# Altium PCB Isolated_Power_Board.pcbdoc
Units mil, origin at the board's own origin, x right, y up, seen from the top; angles counter-clockwise.
Board outline 3937.01 x 3937.01 mil, 2 copper layers (Top Layer, Bottom Layer); 28 components, 6 nets, 108 pads, 0 vias.
Unrouted connection lines stored in the file: 6.
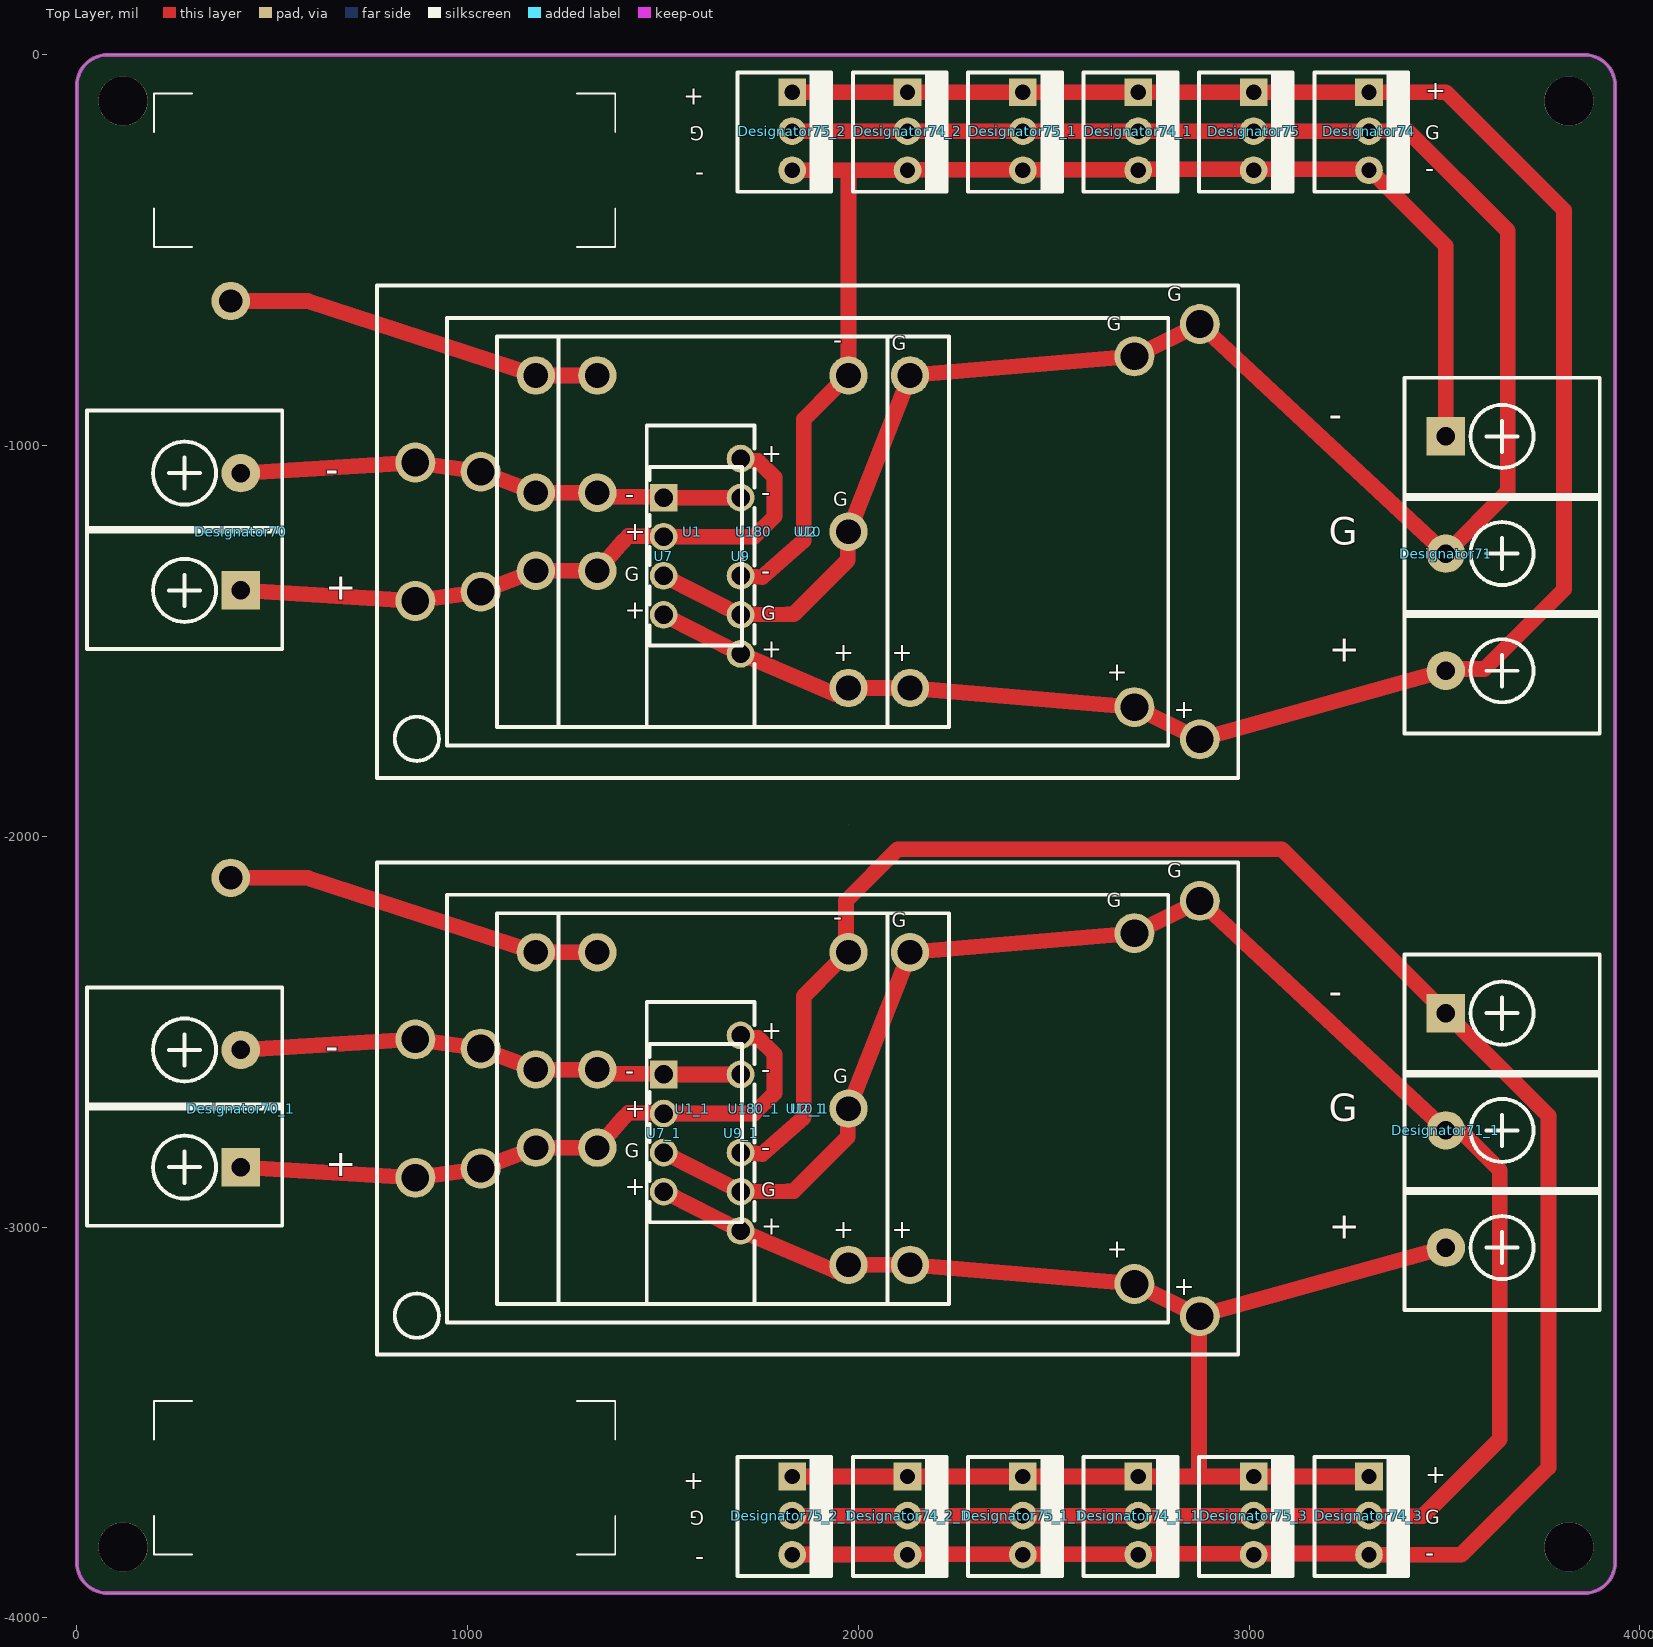
[diagram p0: Top Layer view]
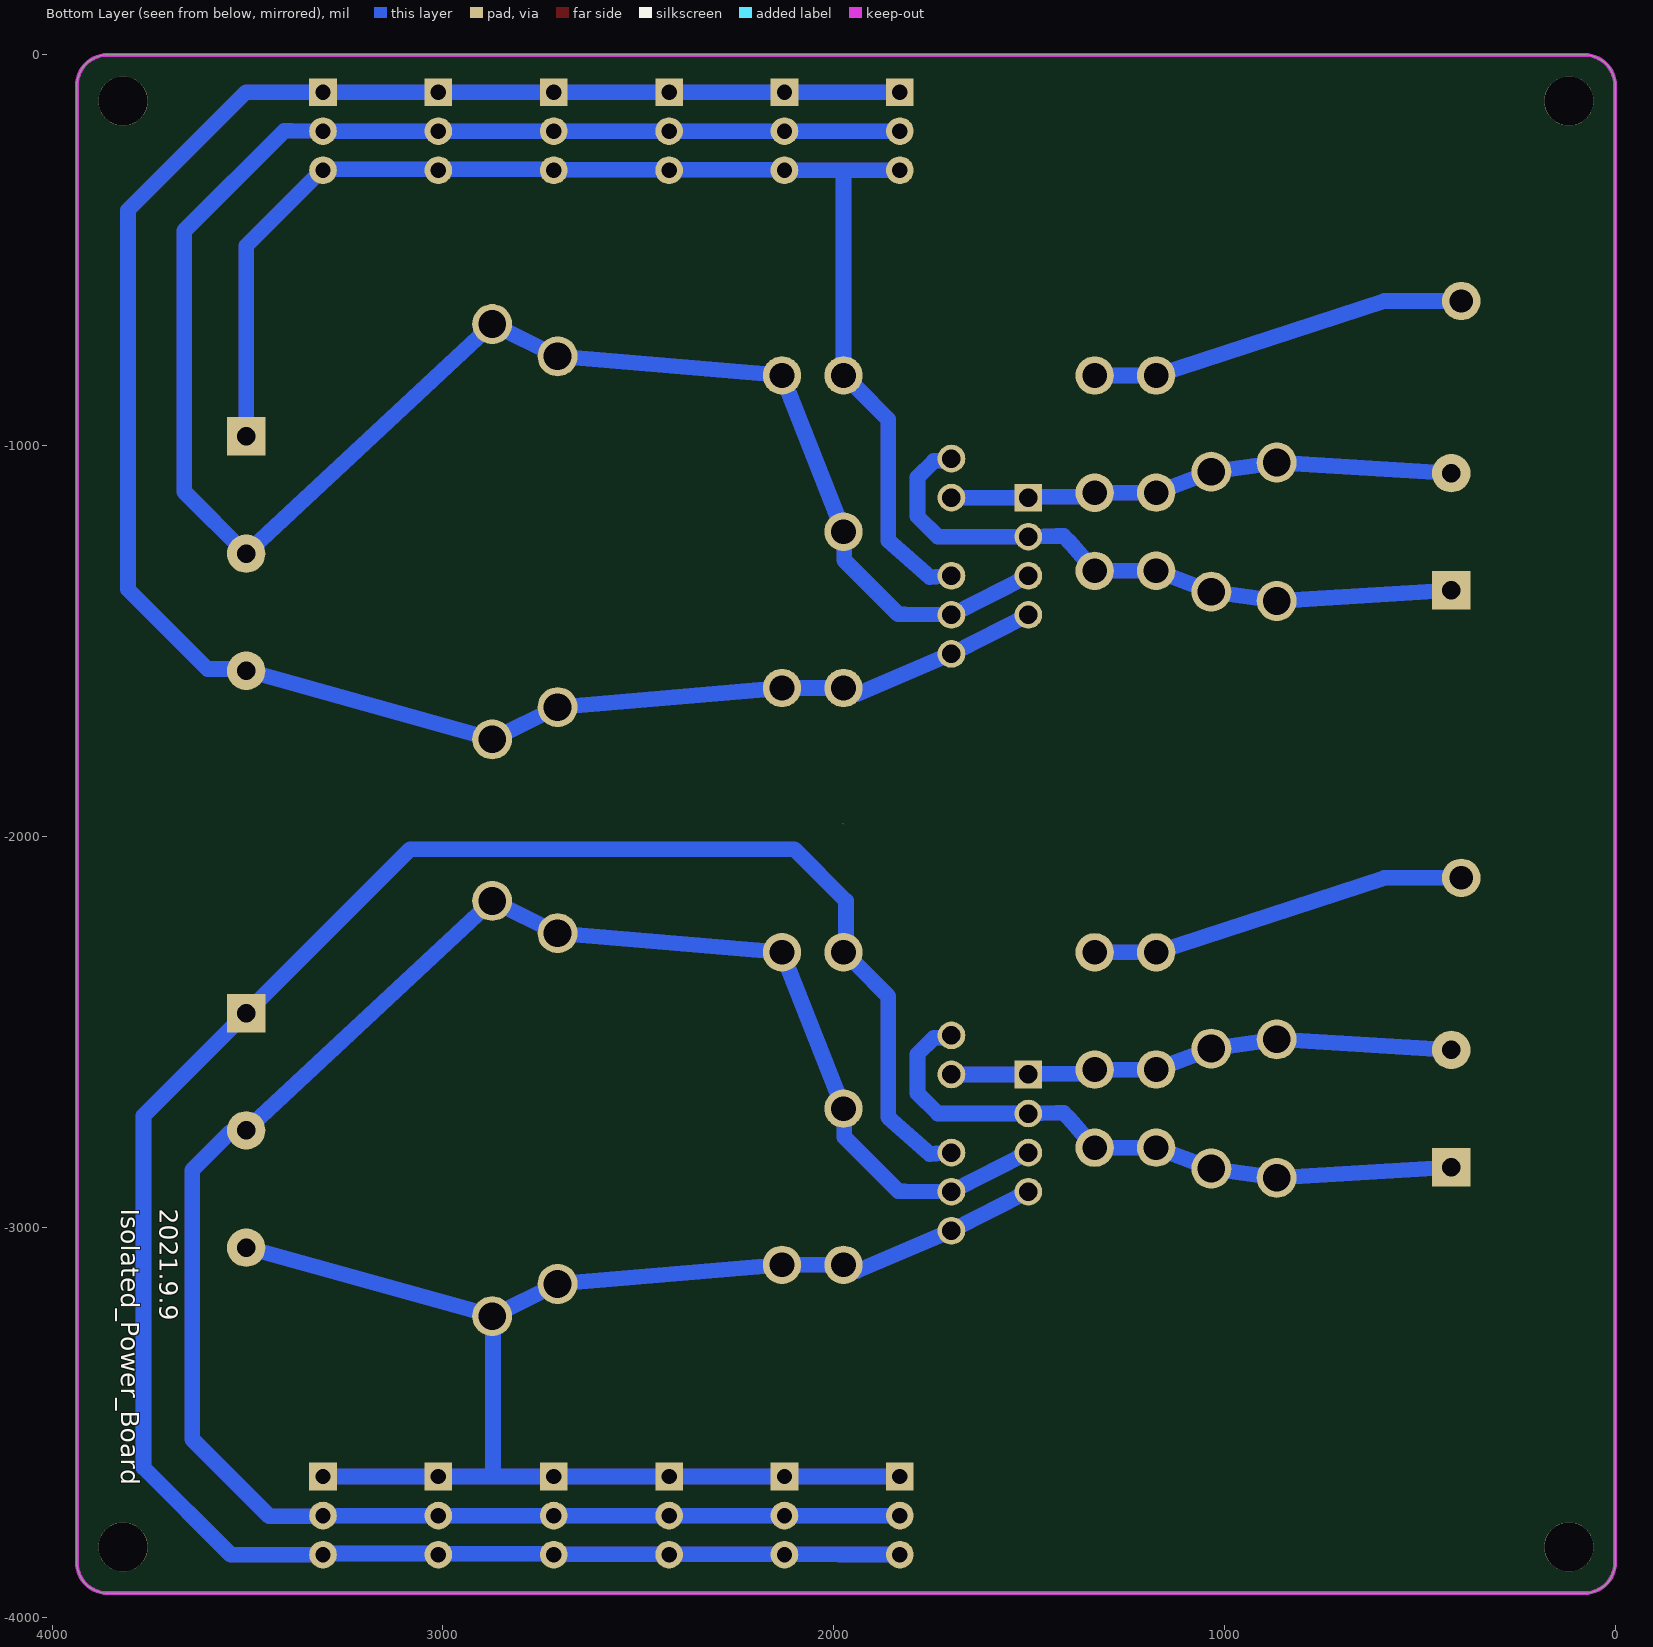
[diagram p1: Bottom Layer view, seen from below]

## Layer stack, top to bottom
Top Solder: solder mask 0.4, Solder Resist, Dk 3.5
Top Layer: signal copper 1.4
Dielectric1: dielectric 12.6, FR-4, Dk 4.8
Bottom Layer: signal copper 1.4
Bottom Solder: solder mask 0.4, Solder Resist, Dk 3.5

## Board outline
78.74,-3937.01 cw(c78.74,-3858.27) 0,-3858.27 0,-78.74 cw(c78.74,-78.74) 78.74,0 3858.27,0 cw(c3858.27,-78.74) 3937.01,-78.74 3937.01,-3858.27 cw(c3858.27,-3858.27) 3858.27,-3937.01

## Design rules (kind name [scope] priority, off if disabled: settings)
Clearance [All] p1: gap=10 ignorepadtopadclearanceinfootprint=FALSE except(0: Arc-Hole Track-Hole SMDPad-Hole THPad-Hole Via-Hole Fill-Hole Poly-Hole Region-Hole Text-Hole)
HoleSize [All] p1 off: absolutevalues=TRUE maxlimit=100 minlimit=1 maxpercent=80.000 minpercent=20.000
MinimumSolderMaskSliver [All] p1 off: minsoldermaskwidth=10
PolygonConnect [All] p1: connectstyle=Relief reliefconductorwidth=10 reliefentries=4 polygonreliefangle="90 Angle" airgapwidth=10
RoutingVias [All] p1: holewidth=28 width=50 viastyle="Through Hole" minholewidth=28 minwidth=50 maxholewidth=28 maxwidth=50
SilkToSolderMaskClearance [IsPad] p1 off: minsilkscreentomaskgap=10 clearancetoexposedcopper=TRUE
SolderMaskExpansion [All] p1: expansion=4 istentingtop=FALSE
Width [All] p1 off: maxlimit=10 minlimit=10 preferedwidth=10
27 further rules are at their usual default settings.

## Components (designator, comment, footprint, x,y, rotation, side; value= is the part's Value field where it differs from the comment)
Designator70 "Comment" KF7620-2P 275.59,-1220.47 r90 top
Designator70_1 "Comment" KF7620-2P 275.59,-2696.85 r90 top
Designator71 "Comment" KF7620-3P 3647.64,-1276.38 r270 top
Designator71_1 "Comment" KF7620-3P 3647.64,-2752.76 r270 top
Designator74 "Comment" KF2510-LI-3P 3307.09,-195.28 r270 top
Designator74_1 "Comment" KF2510-LI-3P 2716.54,-195.28 r270 top
Designator74_1_1 "Comment" KF2510-LI-3P 2716.54,-3738.58 r270 top
Designator74_2 "Comment" KF2510-LI-3P 2125.98,-195.28 r270 top
Designator74_2_1 "Comment" KF2510-LI-3P 2125.98,-3738.58 r270 top
Designator74_3 "Comment" KF2510-LI-3P 3307.09,-3738.58 r270 top
Designator75 "Comment" KF2510-LI-3P 3011.81,-195.28 r270 top
Designator75_1 "Comment" KF2510-LI-3P 2421.26,-195.28 r270 top
Designator75_1_1 "Comment" KF2510-LI-3P 2421.26,-3738.58 r270 top
Designator75_2 "Comment" KF2510-LI-3P 1830.71,-195.28 r270 top
Designator75_2_1 "Comment" KF2510-LI-3P 1830.71,-3738.58 r270 top
Designator75_3 "Comment" KF2510-LI-3P 3011.81,-3738.58 r270 top
U1 "URA2409YMD-10WR3" PWRM-TH_URAXXXXYMD-10WR3 1574.8,-1220.47 r90 top
U1_1 "URA2409YMD-10WR3" PWRM-TH_URAXXXXYMD-10WR3 1574.8,-2696.85 r90 top (schematic designator U1)
U2 "HLK-10M12" PWRM-TH_HLK-10M12 1870.08,-1220.47 r0 top
U2_1 "HLK-10M12" PWRM-TH_HLK-10M12 1870.08,-2696.85 r0 top (schematic designator U2)
U7 "B1212S-1WR2" PWRM-TH_BXXXXS-1W 1501.73,-1283.14 r90 top
U7_1 "B1212S-1WR2" PWRM-TH_BXXXXS-1W 1501.73,-2759.52 r90 top (schematic designator U7)
U9 "A1212S-2WR2" PWRM-TH_A1212S-2WR2 1698.59,-1283.14 r270 top
U9_1 "A1212S-2WR2" PWRM-TH_A1212S-2WR2 1698.59,-2759.52 r270 top (schematic designator U9)
U10 "HLK-20M12" PWRM-TH_HLK-20MXX 1870.08,-1220.47 r0 top
U10_1 "HLK-20M12" PWRM-TH_HLK-20MXX 1870.08,-2696.85 r0 top (schematic designator U10)
U180 "PWRM-TH_URB4805YMD_10WR3" PWRM-TH_URB4805YMD_10WR3 1732.28,-1220.47 r0 top (schematic designator U18)
U180_1 "PWRM-TH_URB4805YMD_10WR3" PWRM-TH_URB4805YMD_10WR3 1732.28,-2696.85 r0 top (schematic designator U18)

## Footprints (in the part's own frame and the unit in brackets; to place one, negate y for a bottom-side part, rotate by r counter-clockwise, add the part's x,y. Pads: shape width x height; smd on the part's side, far side on the other; paste and mask are expansions set on the pad)
KF2510-LI-3P [mm] "接插件/2A"
  rect 1.8x1.8 hole 1: 1(-2.54,0)
  round 1.8 hole 1: 2(0,0) 3(2.54,0)
  silkscreen extent -3.81,-3.56 3.94,2.54, body extent -3.81,-3.5 3.81,2.4, height 11.05
KF7620-2P [mm] "15.2*12*12mm(长宽高)"
  rect 2.5x2.5 hole 1.2: 1(-3.81,-3.65)
  round 2.5 hole 1.2: 2(3.81,-3.65)
  silkscreen extent -7.62,-6.35 7.87,6.35, body extent -7.62,-6.2 8.32,6.2, height 12.45
KF7620-3P [mm] "22.8*12*12mm(长宽高)"
  rect 2.5x2.5 hole 1.2: 1(-7.62,-3.65)
  round 2.5 hole 1.2: 2(0,-3.65) 3(7.62,-3.65)
  silkscreen extent -11.43,-6.35 11.68,6.35, body extent -11.43,-6.2 12.13,6.2, height 12.45
PWRM-TH_A1212S-2WR2 [mm]
  round 1.8 hole 1.2: 1(-6.35,0) 2(-3.81,0) 4(1.27,0) 5(3.81,0) 6(6.35,0)
  silkscreen extent -8.51,-6.1 11.1,0.91
PWRM-TH_BXXXXS-1W [mm]
  rect 1.8x1.8 hole 1.2: 1(3.81,0)
  round 1.8 hole 1.2: 2(1.27,0) 3(-1.27,0) 4(-3.81,0)
  silkscreen extent -5.8,-5.1 5.8,0.9
PWRM-TH_HLK-10M12 [mm]
  round 2.6 hole 1.8: 1(-21.25,3.9) 2(-21.25,-3.9) 3(21.25,11.4) 4(21.25,-11.4)
  silkscreen extent -23.45,-13.9 23.45,13.9
PWRM-TH_HLK-20MXX [mm]
  round 2.6 hole 1.8: 1(-25.5,4.5) 2(-25.5,-4.5) 3(25.5,13.5) 4(25.5,-13.5)
  silkscreen extent -28,-16 28,16
PWRM-TH_URAXXXXYMD-10WR3 [mm]
  round 2.5 hole 1.6: 1(2.54,10.159) 2(-2.537,10.156) 3(-10.16,-10.161) 4(0,-10.161) 5(10.16,-10.161) 6(10.157,10.161)
  silkscreen extent -12.7,-12.7 12.7,12.7
PWRM-TH_URB4805YMD_10WR3 [mm]
  round 2.5 hole 1.6: 1(-10.161,2.537) 2(-10.161,-2.543) 3(10.161,-10.16) 5(10.161,10.16) 6(-10.161,10.157)
  silkscreen extent -12.7,-12.7 12.7,12.7

## Free pads (board coordinates)
  round 125.98 hole 125.98 unplated: 1(118.11,-3818.9) 1(118.11,-118.11) 1(3818.9,-3818.9) 1(3818.9,-118.11)
  round 98.43 hole 60: Q(393.7,-2106.3) Q(393.7,-629.92)

## Nets (pads, with @x,y where several pads share a name; then routed paths per layer and width w, separated by ;. In a path a pad name is that pad's centre, name@x,y a point inside that pad or via, vN(x,y) a via of type N, cw(c..) or ccw(c..) an arc to the next point about the centre after c; other vN are vias at no path point)
+IN: Designator70.1 Designator70_1.1 U1.2 U1_1.2 U2.2 U2_1.2 U7.2 U7_1.2 U9.1 U9_1.1 U10.2 U10_1.2 U180.2 U180_1.2 | length 6586.7
  Top Layer w40: Designator70_1.1 U10_1.2 U2_1.2 U1_1.2 1298.56,-2796.91 U180_1.2 1398.12,-2721.56 1399.01,-2720.55 1411.67,-2707.89 1428.69,-2707.89 U7_1.2 1733.39,-2709.52 1785.43,-2657.48 1785.43,-2557.48 1743.38,-2515.43 1704.49,-2515.43 U9_1.1 ; Designator70.1 U10.2 U2.2 U1.2 1298.56,-1320.53 U180.2 1398.12,-1245.19 1399.01,-1244.18 1411.67,-1231.51 1428.69,-1231.51 U7.2 1733.39,-1233.14 1785.43,-1181.1 1785.43,-1081.1 1743.38,-1039.05 1704.49,-1039.05 U9.1
  Bottom Layer w40: Designator70_1.1 U10_1.2 U2_1.2 U1_1.2 1298.56,-2796.91 U180_1.2 1398.12,-2721.56 1399.01,-2720.55 1411.67,-2707.89 1428.69,-2707.89 U7_1.2 1733.39,-2709.52 1785.43,-2657.48 1785.43,-2557.48 1743.38,-2515.43 1704.49,-2515.43 U9_1.1 ; Designator70.1 U10.2 U2.2 U1.2 1298.56,-1320.53 U180.2 1398.12,-1245.19 1399.01,-1244.18 1411.67,-1231.51 1428.69,-1231.51 U7.2 1733.39,-1233.14 1785.43,-1181.1 1785.43,-1081.1 1743.38,-1039.05 1704.49,-1039.05 U9.1
+OUT: Designator71.3 Designator71_1.3 Designator74.1 Designator74_1.1 Designator74_1_1.1 Designator74_2.1 Designator74_2_1.1 Designator74_3.1 Designator75.1 Designator75_1.1 Designator75_1_1.1 Designator75_2.1 Designator75_2_1.1 Designator75_3.1 U1.3 U1_1.3 U2.4 U2_1.4 U7.4 U7_1.4 U9.6 U9_1.6 U10.4 U10_1.4 U180.3 U180_1.3 | length 18951
  Top Layer w40: U7_1.4 U9_1.6 U1_1.3@1941.15,-3112.67 ; U7.4 U9.6 U1.3@1941.15,-1636.29 ; Designator75_2_1.1@1829.13,-3640.16 Designator75_2_1.1 ; Designator75_2_1.1 Designator74_2_1.1 ; Designator75_2.1 Designator74_2.1 Designator75_1.1 Designator74_1.1 Designator75.1 Designator74.1 3503.94,-95.28 3806.04,-397.38 3806.04,-1367.98 3602.36,-1571.65 3508.66,-1571.65 Designator71.3 3502.54,-1575.59 2874.81,-1750.57 U10.4 U2.4 U180.3 U1.3 ; U1_1.3 U180_1.3 U2_1.4 U10_1.4 ; Designator74_2_1.1 2421.25,-3638.6 Designator74_1_1.1 ; Designator74_1_1.1 2872.11,-3638.6 ; Designator75_3.1 2872.11,-3638.6 ; Designator75_3.1 Designator74_3.1 ; Designator71_1.3@3508.66,-3048.03 Designator71_1.3 3502.54,-3051.97 2874.81,-3226.95 U10_1.4 ; 2872.11,-3638.6 2872.11,-3230.25 U10_1.4
  Bottom Layer w40: U7_1.4 U9_1.6 U1_1.3@1941.15,-3112.67 ; U7.4 U9.6 U1.3@1941.15,-1636.29 ; Designator75_2_1.1@1829.13,-3640.16 Designator75_2_1.1 ; Designator75_2_1.1 Designator74_2_1.1 ; Designator75_2.1 Designator74_2.1 Designator75_1.1 Designator74_1.1 Designator75.1 Designator74.1 3503.94,-95.28 3806.04,-397.38 3806.04,-1367.98 3602.36,-1571.65 3508.66,-1571.65 Designator71.3 3502.54,-1575.59 2874.81,-1750.57 U10.4 U2.4 U180.3 U1.3 ; U1_1.3 U180_1.3 U2_1.4 U10_1.4 ; Designator74_2_1.1 2421.25,-3638.6 Designator74_1_1.1 ; Designator74_1_1.1 2872.11,-3638.6 ; Designator75_3.1 2872.11,-3638.6 ; Designator75_3.1 Designator74_3.1 ; Designator71_1.3@3508.66,-3048.03 Designator71_1.3 3502.54,-3051.97 2874.81,-3226.95 U10_1.4 ; 2872.11,-3638.6 2872.11,-3230.25 U10_1.4
-IN: Designator70.2 Designator70_1.2 U1.1 U1_1.1 U2.1 U2_1.1 U7.1 U7_1.1 U9.2 U9_1.2 U10.1 U10_1.1 U180.1 U180_1.1 | length 5187.3
  Top Layer w40: Designator70_1.2 U10_1.1 U2_1.1 1174.75,-2596.95 1174.85,-2596.95 1298.64,-2597.85 U180_1.1@1332.23,-2598.09 ; Designator70.2 U10.1 U2.1 1174.75,-1120.57 1174.85,-1120.57 1298.64,-1121.47 U180.1@1332.23,-1121.72 ; U180_1.1 1342.8,-2607.51 1499.73,-2607.51 U7_1.1 U9_1.2 ; U180.1 1342.8,-1131.14 1499.73,-1131.14 U7.1 U9.2
  Bottom Layer w40: Designator70_1.2 U10_1.1 U2_1.1 1174.75,-2596.95 1174.85,-2596.95 1298.64,-2597.85 U180_1.1@1332.23,-2598.09 ; Designator70.2 U10.1 U2.1 1174.75,-1120.57 1174.85,-1120.57 1298.64,-1121.47 U180.1@1332.23,-1121.72 ; U180_1.1 1342.8,-2607.51 1499.73,-2607.51 U7_1.1 U9_1.2 ; U180.1 1342.8,-1131.14 1499.73,-1131.14 U7.1 U9.2
-OUT: Designator71.1 Designator71_1.1 Designator74.3 Designator74_1.3 Designator74_1_1.3 Designator74_2.3 Designator74_2_1.3 Designator74_3.3 Designator75.3 Designator75_1.3 Designator75_1_1.3 Designator75_2.3 Designator75_2_1.3 Designator75_3.3 U1.5 U1_1.5 U9.4 U9_1.4 | length 18430.9
  Top Layer w40: U9_1.4 1737.65,-2811.96 1754.19,-2812.99 1860.25,-2719.39 1860.25,-2409.38 U1_1.5@1941.15,-2328.48 ; U9.4 1737.65,-1335.58 1754.19,-1336.61 1860.25,-1243.02 1860.25,-933 U1.5@1941.15,-852.1 ; Designator75_2_1.3 1830.92,-3838.58 1831.22,-3838.29 1985.61,-3838.29 2125.41,-3838.01 Designator74_2_1.3 2126.56,-3838.01 2420.09,-3837.42 Designator75_1_1.3 2422.42,-3837.41 2714.78,-3836.83 Designator74_1_1.3 2718.29,-3836.82 3009.46,-3836.24 Designator75_3.3 3014.15,-3836.23 3014.74,-3835.65 3304.15,-3835.65 Designator74_3.3 3543.31,-3838.58 3766.54,-3615.35 3766.54,-2715.36 Designator71_1.1 3083.93,-2032.75 2101.11,-2032.75 1968.5,-2165.35 1968.5,-2290.5 U1_1.5 ; Designator75_2.3 1831.02,-294.97 1974.85,-294.97 ; U1.5 1974.85,-294.97 ; Designator71.1 3503.94,-488.98 3307.28,-292.32 3307.08,-292.32 3011.81,-292.91 2716.53,-293.5 2421.26,-294.09 2125.98,-294.69 1985.41,-294.97 1974.85,-294.97
  Bottom Layer w40: U9_1.4 1737.65,-2811.96 1754.19,-2812.99 1860.25,-2719.39 1860.25,-2409.38 U1_1.5@1941.15,-2328.48 ; U9.4 1737.65,-1335.58 1754.19,-1336.61 1860.25,-1243.02 1860.25,-933 U1.5@1941.15,-852.1 ; Designator75_2_1.3 1830.92,-3838.58 1831.22,-3838.29 1985.61,-3838.29 2125.41,-3838.01 Designator74_2_1.3 2126.56,-3838.01 2420.09,-3837.42 Designator75_1_1.3 2422.42,-3837.41 2714.78,-3836.83 Designator74_1_1.3 2718.29,-3836.82 3009.46,-3836.24 Designator75_3.3 3014.15,-3836.23 3014.74,-3835.65 3304.15,-3835.65 Designator74_3.3 3543.31,-3838.58 3766.54,-3615.35 3766.54,-2715.36 Designator71_1.1 3083.93,-2032.75 2101.11,-2032.75 1968.5,-2165.35 1968.5,-2290.5 U1_1.5 ; Designator75_2.3 1831.02,-294.97 1974.85,-294.97 ; U1.5 1974.85,-294.97 ; Designator71.1 3503.94,-488.98 3307.28,-292.32 3307.08,-292.32 3011.81,-292.91 2716.53,-293.5 2421.26,-294.09 2125.98,-294.69 1985.41,-294.97 1974.85,-294.97
COM_OUT: Designator71.2 Designator71_1.2 Designator74.2 Designator74_1.2 Designator74_1_1.2 Designator74_2.2 Designator74_2_1.2 Designator74_3.2 Designator75.2 Designator75_1.2 Designator75_1_1.2 Designator75_2.2 Designator75_2_1.2 Designator75_3.2 U1.4 U1_1.4 U2.3 U2_1.3 U7.3 U7_1.3 U9.5 U9_1.5 U10.3 U10_1.3 U180.5 U180_1.5 | length 21904.7
  Top Layer w40: U7_1.3 U9_1.5 1818.57,-2908.21 1834.88,-2908.03 1973.23,-2769.68 1973.23,-2698.47 U1_1.4 U180_1.5 U2_1.3 U10_1.3 Designator71_1.2 3507.09,-2755.91 3543.31,-2755.91 3641.73,-2854.33 3641.73,-3543.31 3444.88,-3740.16 3308.66,-3740.16 Designator74_3.2 ; U7.3 U9.5 1818.57,-1431.83 1834.88,-1431.65 1973.23,-1293.3 1973.23,-1222.09 U1.4 U180.5 U2.3 U10.3 Designator71.2 3662.16,-1118.16 3662.16,-450.35 3662.11,-450.3 3405.78,-193.97 3388.89,-193.97 3388.57,-193.97 Designator74.2 Designator75.2 Designator74_1.2 Designator75_1.2 Designator74_2.2 Designator75_2.2 ; Designator75_2_1.2 Designator74_2_1.2 ; Designator74_2_1.2 2421.25,-3738.6 Designator74_1_1.2 ; Designator74_1_1.2 Designator75_3.2 ; Designator75_3.2 Designator74_3.2
  Bottom Layer w40: U7_1.3 U9_1.5 1818.57,-2908.21 1834.88,-2908.03 1973.23,-2769.68 1973.23,-2698.47 U1_1.4 U180_1.5 U2_1.3 U10_1.3 Designator71_1.2 3507.09,-2755.91 3543.31,-2755.91 3641.73,-2854.33 3641.73,-3543.31 3444.88,-3740.16 3308.66,-3740.16 Designator74_3.2 ; U7.3 U9.5 1818.57,-1431.83 1834.88,-1431.65 1973.23,-1293.3 1973.23,-1222.09 U1.4 U180.5 U2.3 U10.3 Designator71.2 3662.16,-1118.16 3662.16,-450.35 3662.11,-450.3 3405.78,-193.97 3388.89,-193.97 3388.57,-193.97 Designator74.2 Designator75.2 Designator74_1.2 Designator75_1.2 Designator74_2.2 Designator75_2.2 ; Designator75_2_1.2 Designator74_2_1.2 ; Designator74_2_1.2 2421.25,-3738.6 Designator74_1_1.2 ; Designator74_1_1.2 Designator75_3.2 ; Designator75_3.2 Designator74_3.2
EN: pad.Q U1.6 U1_1.6 U180.6 U180_1.6 | length 3875.4
  Top Layer w40: pad.Q@393.7,-2106.3 590.55,-2106.3 U1_1.6 U180_1.6 ; pad.Q@393.7,-629.92 590.55,-629.92 U1.6 U180.6
  Bottom Layer w40: pad.Q@393.7,-2106.3 590.55,-2106.3 U1_1.6 U180_1.6 ; pad.Q@393.7,-629.92 590.55,-629.92 U1.6 U180.6
copper on no net: | length 2.8
  Bottom Layer w0.1: 1974.58,-1969.5 1976.58,-1967.5

## Keep-outs
Keep-Out Layer:
  the board outline again, w10

## Silkscreen, mask and mechanical layers (free items; w line width, h text height)
Top Overlay:
  lines w5: 196.85,-3740.16 196.85,-3838.58 295.28,-3838.58 ; 196.85,-3543.31 196.85,-3444.88 295.28,-3444.88 ; 196.85,-393.7 196.85,-492.13 295.28,-492.13 ; 196.85,-196.85 196.85,-98.43 295.28,-98.43 ; 1279.53,-3838.58 1377.95,-3838.58 1377.95,-3740.16 ; 1279.53,-3444.88 1377.95,-3444.88 1377.95,-3543.31 ; 1279.53,-492.13 1377.95,-492.13 1377.95,-393.7 ; 1279.53,-98.43 1377.95,-98.43 1377.95,-196.85
  text "+" at 1605.44,-71.45 h80 r180
  text "+" at 3451.36,-128.39 h80
  text "G" at 1605.44,-171.45 h60 r180
  text "G" at 3451.36,-228.39 h60
  text "-" at 1605.44,-271.45 h80 r180
  text "-" at 3451.36,-328.39 h80
  text "G" at 2790.95,-641.57 h60
  text "G" at 2635.43,-717.32 h60
  text "-" at 1935.43,-767.32 h80
  text "G" at 2085.43,-767.32 h60
  text "-" at 3203.94,-976.38 h120
  text "+" at 1751.73,-1058.14 h80
  text "-" at 635.43,-1117.32 h120
  text "-" at 1751.73,-1158.14 h80
  text "-" at 1403.31,-1162.36 h80
  text "G" at 1935.43,-1167.32 h60
  text "+" at 1401.73,-1258.14 h80
  text "G" at 3203.94,-1276.38 h120
  text "G" at 1401.73,-1358.14 h60
  text "-" at 1751.73,-1358.14 h80
  text "+" at 635.43,-1417.32 h120
  text "+" at 1401.73,-1458.14 h80
  text "G" at 1751.73,-1458.14 h60
  text "+" at 1751.73,-1558.14 h80
  text "+" at 1935.43,-1567.32 h80
  text "+" at 2085.43,-1567.32 h80
  text "+" at 3203.94,-1576.38 h120
  text "+" at 2635.43,-1617.32 h80
  text "+" at 2806.78,-1713.83 h80
  text "G" at 2790.95,-2117.95 h60
  text "G" at 2635.43,-2193.7 h60
  text "-" at 1935.43,-2243.7 h80
  text "G" at 2085.43,-2243.7 h60
  text "-" at 3203.94,-2452.76 h120
  text "+" at 1751.73,-2534.52 h80
  text "-" at 635.43,-2593.7 h120
  text "-" at 1751.73,-2634.52 h80
  text "-" at 1403.31,-2638.74 h80
  text "G" at 1935.43,-2643.7 h60
  text "+" at 1401.73,-2734.52 h80
  text "G" at 3203.94,-2752.76 h120
  text "G" at 1401.73,-2834.52 h60
  text "-" at 1751.73,-2834.52 h80
  text "+" at 635.43,-2893.7 h120
  text "+" at 1401.73,-2934.52 h80
  text "G" at 1751.73,-2934.52 h60
  text "+" at 1751.73,-3034.52 h80
  text "+" at 1935.43,-3043.7 h80
  text "+" at 2085.43,-3043.7 h80
  text "+" at 3203.94,-3052.76 h120
  text "+" at 2635.43,-3093.7 h80
  text "+" at 2806.78,-3190.21 h80
  text "+" at 1605.44,-3614.76 h80 r180
  text "+" at 3451.36,-3671.7 h80
  text "G" at 1605.44,-3714.76 h60 r180
  text "G" at 3451.36,-3771.7 h60
  text "-" at 1605.44,-3814.76 h80 r180
  text "-" at 3451.36,-3871.7 h80
Bottom Overlay:
  text "2021.9.9" at 3740.16,-2952.76 h80 r90
  text "Isolated_Power_Board" at 3838.58,-2952.76 h80 r90
Mechanical 13:
  lines w5: -2.5,-3858.27 ccw(c78.74,-3858.27) 78.74,-3939.51 3858.27,-3939.51 ccw(c3858.27,-3858.27) 3939.51,-3858.27 3939.51,-78.74 ccw(c3858.27,-78.74) 3858.27,2.5 78.74,2.5 ccw(c78.74,-78.74) -2.5,-78.74 -2.5,-3858.27
Document:
  lines w0.1: 1974.58,-1969.5 1976.58,-1967.5